# Altium PCB MCU.PcbDoc (part 2 of 3)
Units mm, origin at the board's own origin, x right, y up, seen from the top; angles counter-clockwise.
Board outline 98.27 x 98.24 mm, 2 copper layers (Top Layer, Bottom Layer); 274 components, 263 nets, 1117 pads, 8 vias.
Unrouted connection lines stored in the file: 819.
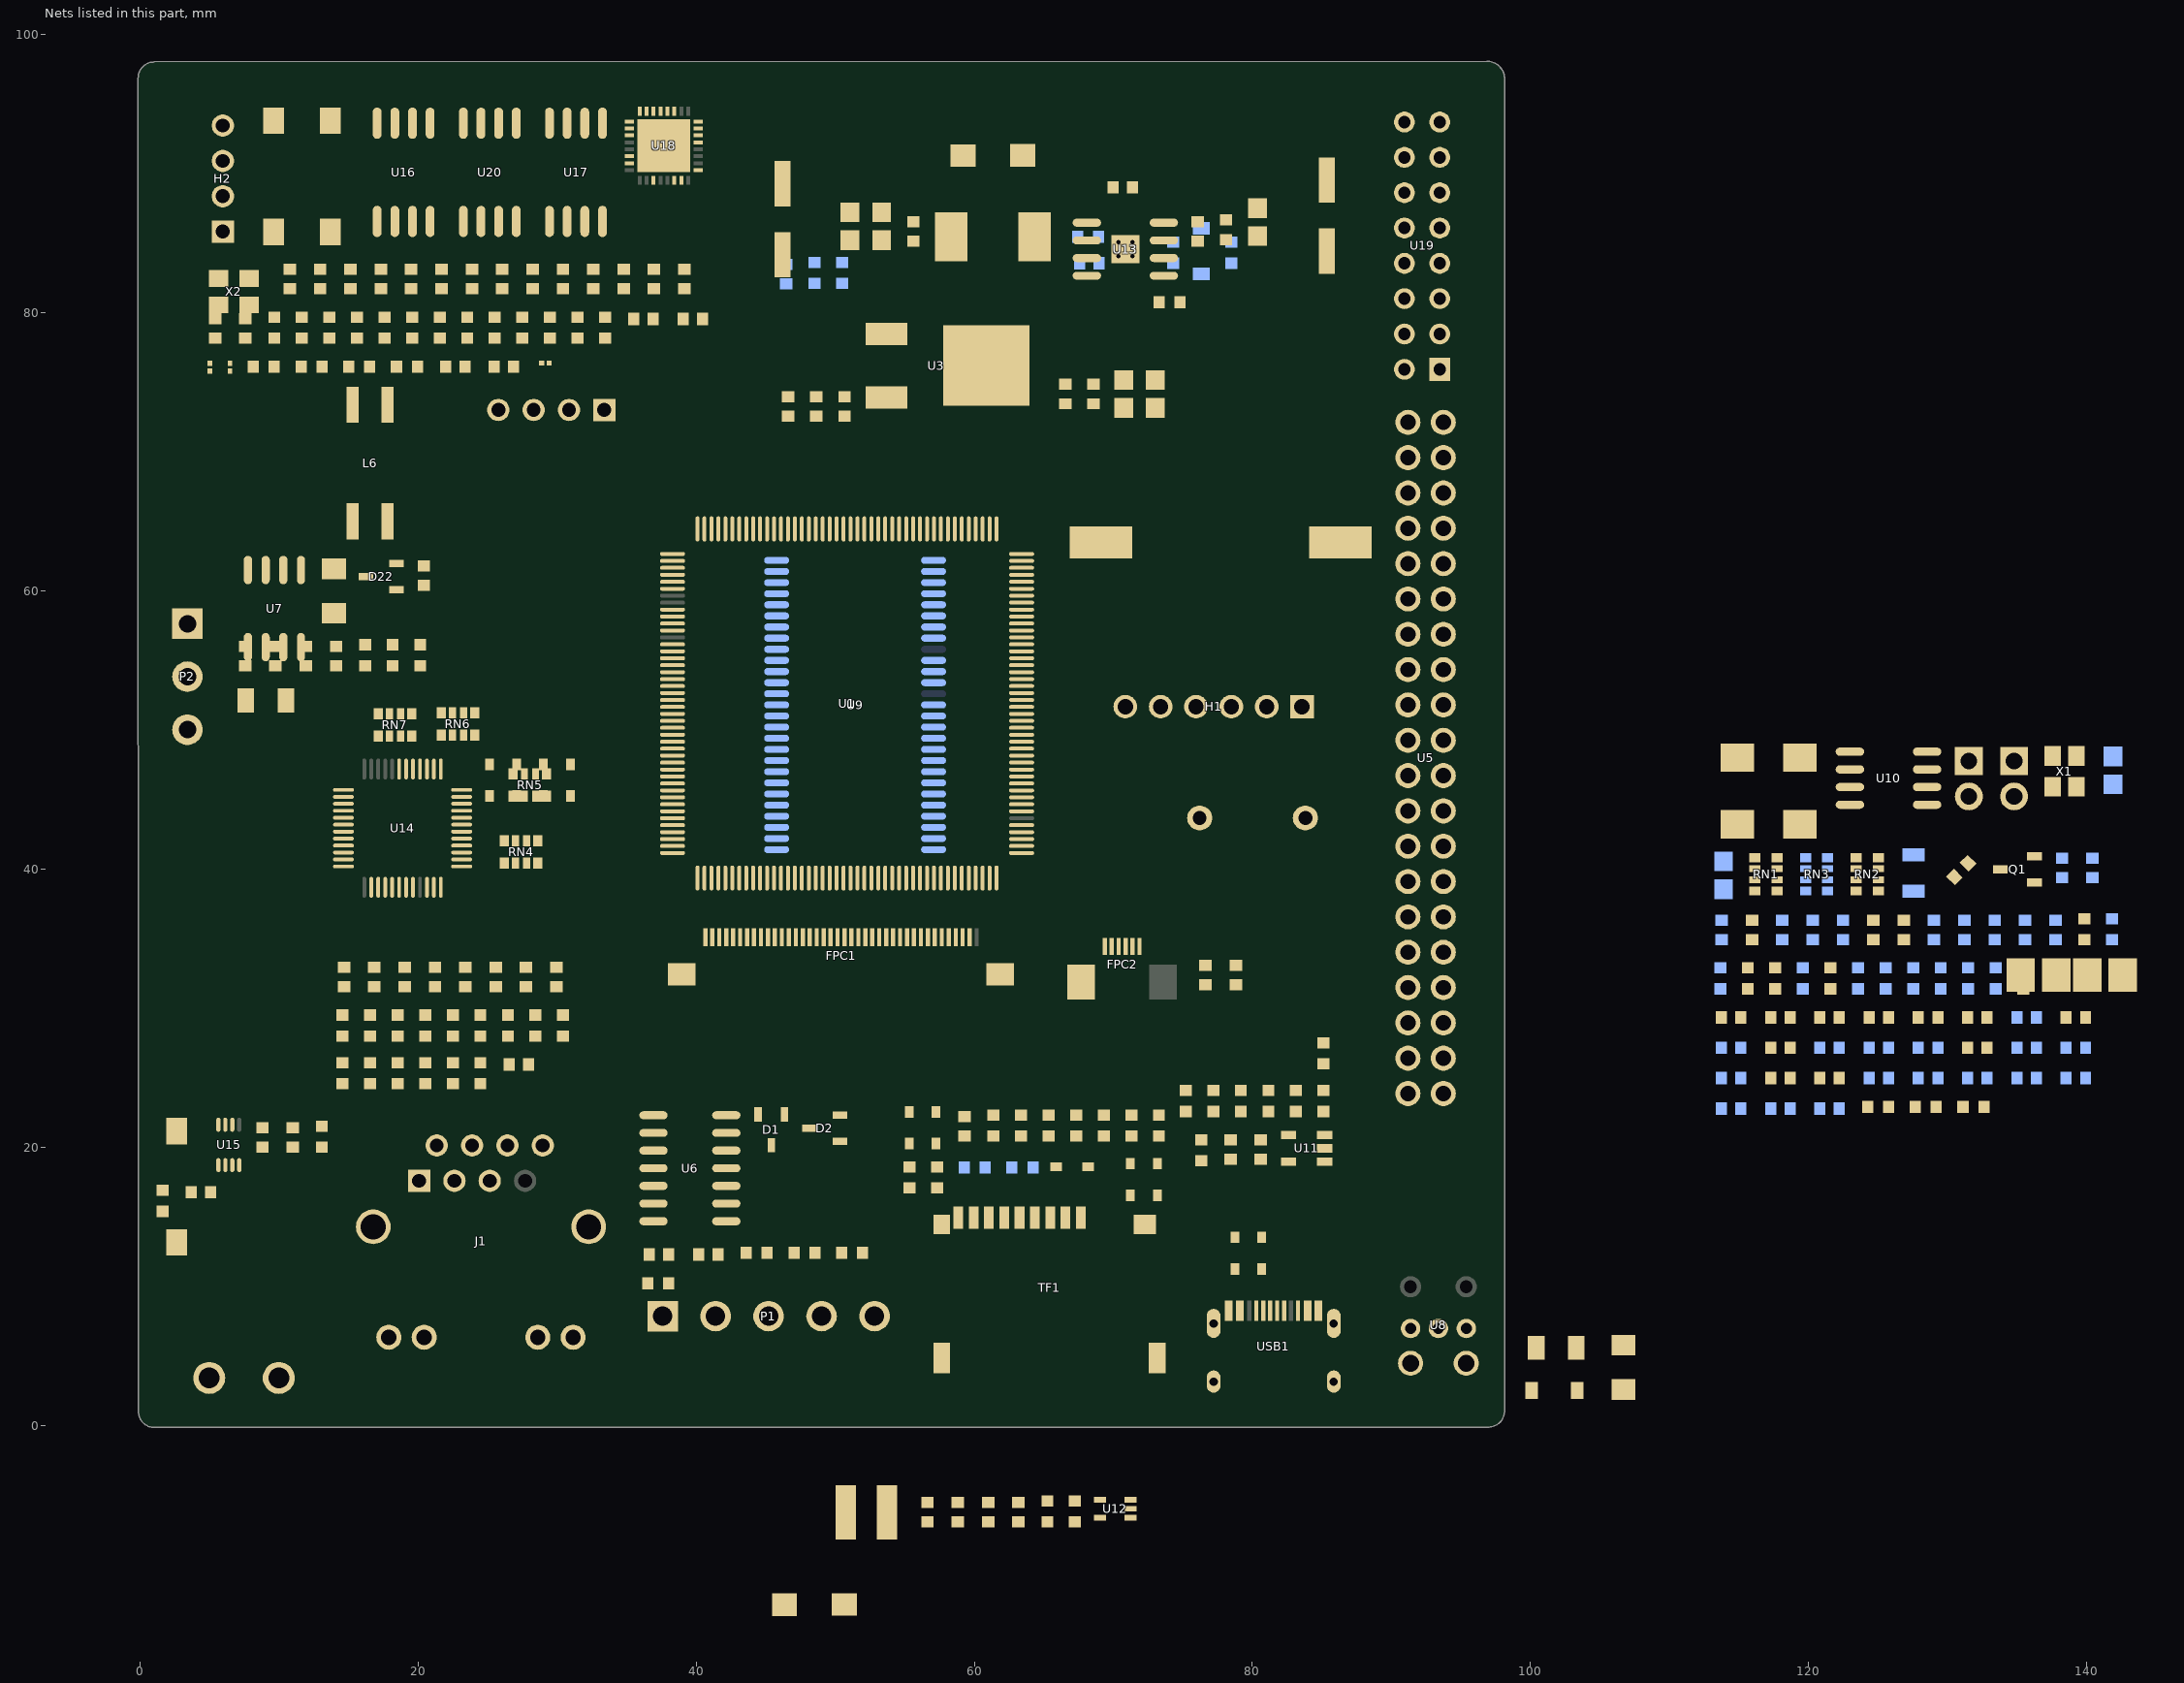
[diagram p2: the nets of this part, all layers, seen from the top]

## Part data
BUZZER1: "驱动方式:有源(内含驱动线路);构造类型:电磁式;额定电压:5V;频率:2.4kHz;声压(SPL):85dB;", Continuous Operating Time=-, Current Consumption=30mA, JLCPCB Part Class="Extended Part", LCSC Part Name="有源(内含驱动线路) 电磁式 2.4kHz", Manufacturer=华能, ManufacturerPart=TMB12A05, Operating Temperature=-40℃~+85℃, Voltage - Supply=4V~8V, Voltage Rating=5V, AddInBom=yes, ConvertToPcb=yes, Datasheet=https://item.szlcsc.com/datasheet/TMB12A05/97297.html, Diameter(φD)=12mm, Driver Circuitry=有源(内含驱动线路), FootprintName=BUZ-TH_BD12.0-P7.60-D0.6-FD, Height=9.8mm, Lead Pitch=-, Length=-, ModelId=16ab50e14c5b4f2c986c135bdba60e37, ModelName=BUZ-TH_D12.0-H9.5-P7.60, ModelTransform=472.44,472.176,0,90,0,0,-0.787,0,-177.165, Mounting Type=插件, Sound Pressure Level(SPL)=85dB, Supplier=LCSC, Supplier Footprint=插件,D=12mm, SupplierPart=C96093, Symbol=TMB12A05, Technology=电磁式, Width=-
C1 C2 C3 C4 C7 C8 C9 C10 C11 C12 C13 C14 C15 C17 C18 C19 C20 C21 C22 C23 C24 C25 C26 C27 C28 C29 C30 C31 C32 C33 C34 C35 C36 C37 C38 C39 C40 C41 C43 C44 C45 C46 C47 C48 C49 C50 C51 C52 C53 C54 C55 C60 C61 C65 C66 C67 C68 C69 C70 C71 C72 C73 C76 C78 C79 C80 C81 C82 C83 C84 C85 C86 C87 C88 C89 C92 C93 C94 C95 C96 C97 C99 C101 C102 C103 C104 C105 C106 C107 C108 C112 C114: library part C0603, "Capacitor", LatestRevisionDate=17-Jul-2002, LatestRevisionNote="Re-released for DXP Platform.", Published=8-Jun-2000, Publisher="Altium Limited"
C5 C6 C16 C42 C74 C75 C98: library part C0805, "Capacitor", LatestRevisionDate=17-Jul-2002, LatestRevisionNote="Re-released for DXP Platform.", Published=8-Jun-2000, Publisher="Altium Limited"
C56 C57 C58 C59: library part C0603_1, "Capacitor", LatestRevisionDate=17-Jul-2002, LatestRevisionNote="Re-released for DXP Platform.", Published=8-Jun-2000, Publisher="Altium Limited"
C62 C63 C64: library part C0603, "CAP CER 0.1UF 50V, 10% X7R 0603", LatestRevisionDate=17-Jul-2002, LatestRevisionNote="Re-released for DXP Platform.", Published=8-Jun-2000, Publisher="Altium Limited"
C77 C100: library part ma35v100m6x8, "容值:100uF;精度:±20%;额定电压:35V;纹波电流:2.9A@100kHz;等效串联电阻(ESR):30mΩ@100kHz;类型:聚合物;", Equivalent Series Resistance(ESR)=30mΩ@100kHz, JLCPCB Part Class="Extended Part", LCSC Part Name="100uF ±20% 35V", Manufacturer=JIERR(捷而瑞), ManufacturerPart=MA35V100M6X8, Operating Temperature=-55℃~+105℃, Ripple Current=2.9A@100kHz, Tolerance=±20%, Voltage Rating=35V, AddInBom=yes, ConvertToPcb=yes, Datasheet=https://item.szlcsc.com/datasheet/MA35V100M6X8/48680161.html, Diameter=6.3mm, FootprintName=CAP-SMD_BD6.3-L6.6-W6.6-RD, Height - Seated (Max)=7mm, Lifetime=2000hrs@105℃, ModelId=901941a22e384f799727a46cfda77174, ModelName=CAP-SMD_L6.6-W6.6-H7.0-LS7.2, ModelTransform=307.086,259.842,0,0,0,0,0,0,0, Polarity type=有极性, Supplier=LCSC, Supplier Footprint=SMD,D6.3xL7.7mm, SupplierPart=C46550467, Symbol=MA35V100M6X8, Type=聚合物
C90 C91: library part 0201-C, "容值:1uF;精度:±20%;额定电压:6.3V;温度系数:X5R;", JLCPCB Part Class="Extended Part", LCSC Part Name="1uF ±20% 6.3V", Manufacturer=muRata(村田), ManufacturerPart=GRM033R60J105MEA2D, Temperature Coefficient=X5R, Tolerance=±20%, Voltage Rating=6.3V, AddInBom=yes, ConvertToPcb=yes, Datasheet=https://item.szlcsc.com/datasheet/GRM033R60J105MEA2D/78057.html, FootprintName=C0201, ModelId=e8033a7cb35143ffb28e3b81b2577ea0, ModelName=C0201_L0.6-W0.3-H0.3, ModelTransform=23.622,11.811,0,0,0,0,0,0,0, Supplier=LCSC, Supplier Footprint=0201, SupplierPart=C76930, Symbol=GRM033R60J105MEA2D
C109 C111: library part cc1206kkx7rdbb102, "容值:1nF;精度:±10%;额定电压:2kV;温度系数:X7R;", JLCPCB Part Class="Extended Part", LCSC Part Name="1nF ±10% 2kV", Manufacturer=YAGEO(国巨), ManufacturerPart=CC1206KKX7RDBB102, Temperature Coefficient=X7R, Tolerance=±10%, Voltage Rating=2kV, AddInBom=yes, ConvertToPcb=yes, Datasheet=https://item.szlcsc.com/datasheet/CC1206KKX7RDBB102/24367.html, FootprintName=C1206, ModelId=e4be705b945545a48e666415e3682bd8, ModelName=C1206_L3.2-W1.6-H1.3, ModelTransform=125.984,62.992,0,0,0,0,0,0,0, Supplier=LCSC, Supplier Footprint=1206, SupplierPart=C23631, Symbol=CC1206KKX7RDBB102
D1 D2 D22: "极性:单向;反向截止电压(Vrwm):12V;钳位电压:19V;峰值脉冲电流(Ipp):34A@8/20us；30A@8/20us;峰值脉冲功率(Ppp):600W@8/20us;击穿电压(VBR):13.3V;", Clamping Voltage=19V, JLCPCB Part Class="Basic Part", Junction Capacitance=75pF, LCSC Part Name="单向TVS 12V截止 峰值浪涌电流：34A@8/20us 30A@8/20us", Manufacturer=PROTEK, ManufacturerPart=PSM712-LF-T7, Operating Temperature=-55℃~+150℃, Peak Pulse Current (Ipp)=34A@8/20us；30A@8/20us, Peak Pulse Power Dissipation (Ppp)=600W@8/20us, Reverse Leakage Current (Ir)=1uA；20uA, Reverse Stand-Off Voltage (Vrwm)=12V, Voltage - Breakdown=13.3V, AddInBom=yes, ConvertToPcb=yes, Datasheet=https://item.szlcsc.com/datasheet/PSM712-LF-T7/33642.html, FootprintName=SOT-23-3_L3.0-W1.7-P0.95-LS2.9-BR, level of protection="IEC 61000-4-4；IEC 61000-4-5；IEC 61000-4-2", ModelId=89cb27a44ab2466697082bb9fd73a7d0, ModelName=SOT-23-3L_L2.9-W1.6-H1.1-LS2.8-P0.95, ModelTransform=114.173,110.236,0,90,0,0,0,0,0, Polarity=单向, Supplier=LCSC, Supplier Footprint=SOT-23, SupplierPart=C32677, Symbol=PSM712-LF-T7, Type=TVS
D3 D6: library part ss34_c7420365, "二极管配置:独立式;正向压降(Vf):550mV@3A;直流反向耐压(Vr):40V;整流电流:3A;", Current - Rectified=3A, JLCPCB Part Class="Extended Part", LCSC Part Name="电压:40V 电流:3A", Manufacturer=R+O(宏嘉诚), ManufacturerPart=SS34, Reverse Leakage Current (Ir)=200uA@40V, Voltage - DC Reverse(Vr)=40V, Voltage - Forward(Vf@If)=550mV@3A, AddInBom=yes, ConvertToPcb=yes, Datasheet=https://item.szlcsc.com/datasheet/SS34/8397187.html, Diode Configuration=独立式, FootprintName=SMA_L4.3-W2.6-LS5.0-FD, ModelId=7e24bebe6cd74171ae8c9de6fc5b78aa, ModelName=SMA_L4.3-W2.6-LS5.0-FD, ModelTransform=198.4248,103.5431,0,180,0,0,-0.001,0,0, Supplier=LCSC, Supplier Footprint=SMA(DO-214AC), SupplierPart=C7420365, Symbol=SS34_C7420365
D4 D5 D8 D9: library part SMBJ5.0CA_C19077559, "PWR 5V", Clamping Voltage=9.2V, JLCPCB Part Class="Extended Part", Manufacturer=宏嘉诚, Operating Temperature=-, Peak Pulse Current (Ipp)=65.22A, Peak Pulse Power Dissipation (Ppp)=600W, Reverse Leakage Current (Ir)=800uA, Reverse Stand-Off Voltage (Vrwm)=5V, Voltage - Breakdown=7V, Add into BOM=yes, Convert to PCB=yes, Datasheet=https://atta.szlcsc.com/upload/public/pdf/source/20250107/474F05451FC8AB27D7FA0238914F96F6.pdf, Device=SMBJ5.0CA_C19077559, LCSC Part Name=SMBJ5.0CA, Manufacturer Part=SMBJ5.0CA, Polarity=双向, Supplier=LCSC, Supplier Footprint=SMB, Supplier Part=C19077559, Symbol=SMBJ5.0CA_C19077559, Type=TVS
D10 D11 D12 D13 D14 D15 D16 D17 D18 D20 D21: "极性:单向;反向截止电压(Vrwm):3.6V;钳位电压:7.7V;峰值脉冲电流(Ipp):25A@8/20us;峰值脉冲功率(Ppp):170W@8/20us;击穿电压(VBR):7.5V;", Clamping Voltage=7.7V, JLCPCB Part Class="Extended Part", Junction Capacitance=4.5pF, LCSC Part Name="单向TVS 3.6V截止 峰值浪涌电流：25A@8/20us", Manufacturer=TI(德州仪器), ManufacturerPart=ESDS311DYFR, Operating Temperature=-40℃~+125℃, Peak Pulse Current (Ipp)=25A@8/20us, Peak Pulse Power Dissipation (Ppp)=170W@8/20us, Reverse Leakage Current (Ir)=5nA, Reverse Stand-Off Voltage (Vrwm)=3.6V, Voltage - Breakdown=7.5V, AddInBom=yes, ConvertToPcb=yes, Datasheet=https://www.ti.com.cn/cn/lit/ds/symlink/esds311.pdf?ts=1736913524660&ref_url=https%253A%252F%252Fwww.ti.com.cn%252Fsitesearch%252Fzh-cn%252Fdocs%252Funiversalsearch.tsp%253FlangPref%253Dzh-CN%2526nr%253D9%2526searchTerm%253DESDS311DYFR, FootprintName=SOD-323_L1.7-W1.3-LS2.6-RD-1, level of protection="IEC 61000-4-4；IEC 61000-4-5；IEC 61000-4-2", ModelId=eba151483b2844ffacda3a6d97308fa1, ModelName=SOD-323_L1.7-W1.3-LS2.6-RD-1, ModelTransform=100.394,49.2125,0,0,0,0,0,0,0, Number of Channels=单路, Polarity=单向, Supplier=LCSC, Supplier Footprint=SOD-323, SupplierPart=C30938562, SymbolName=ESDS311DYFR, Type=TVS
FPC1: "锁定特性:翻盖式;触点类型:下接;触点数量:40P;间距:0.5mm;安装方式:卧贴;工作温度:-45℃~+85℃;", Current Rating (Max)=500mA, JLCPCB Part Class="Extended Part", LCSC Part Name="翻盖式 下接 P数:40P 间距:0.5mm", Manufacturer=JS(钜硕电子), ManufacturerPart=AFC01-S40FCA-00, Operating Temperature=-45℃~+85℃, Rated Voltage (Max)=50V, AddInBom=yes, Contact Material=铜合金, Contact Plating=锡, Contact Type=下接, ConvertToPcb=yes, Datasheet=https://item.szlcsc.com/datasheet/AFC01-S40FCA-00/253933.html, FFC, FCB Thickness=0.3mm, FootprintName=FPC-SMD_AFC01-S40FCA-00, Height Above Board=2mm, Locking Feature=翻盖式, ModelId=458e5f3c71f743329f5584acd337d3c8, ModelName=FPC-SMD_AFC01-S40FCA-00, ModelTransform=961.0217,240.157,0,0,0,0,0,-52.441,0, Mounting Type=卧贴, Number of Contacts=40P, Pitch=0.5mm, Supplier=LCSC, Supplier Footprint=SMD,P=0.5mm,卧贴, SupplierPart=C262674, Symbol=AFC01-S40FCA-00
FPC2: library part fpc-05f-6ph20_1, "锁定特性:翻盖式;触点类型:下接;触点数量:6P;间距:0.5mm;安装方式:卧贴;工作温度:-25℃~+85℃;", Current Rating (Max)=500mA, JLCPCB Part Class="Extended Part", LCSC Part Name="翻盖式 下接 P数:6P 间距:0.5mm", Manufacturer=XUNPU(讯普), ManufacturerPart=FPC-05F-6PH20, Operating Temperature=-25℃~+85℃, Rated Voltage (Max)=50V, AddInBom=yes, Contact Material=磷青铜, Contact Plating=锡, Contact Type=下接, ConvertToPcb=yes, Datasheet=https://item.szlcsc.com/datasheet/FPC-05F-6PH20/3056894.html, FFC, FCB Thickness=0.3mm, FootprintName=FPC-SMD_6P-P0.50_XUNPU_FPC-05F-6PH20, Height Above Board=2mm, Locking Feature=翻盖式, ModelId=f0153d283bb647ab8cc6ddf5c8ee15be, ModelName=FPC-SMD_6P-P0.50_XUNPU_FPC-05F-6PH20, ModelTransform=291.338,220.472,0,0,0,0,-0.001,-45.276,0, Mounting Type=卧贴, Number of Contacts=6P, Pitch=0.5mm, Supplier=LCSC, Supplier Footprint=SMD,P=0.5mm,卧贴, SupplierPart=C2856796, Symbol=FPC-05F-6PH20
H1: "插针结构:1x6P;间距:2.54mm;行距:-;圆针/方针:方针;安装方式:直插;排数:单排;总PIN位数:6P;额定电流:3A;额定电压:250V;配合针长度:6mm;塑高:2.5mm;端接针长度:3mm;触头材质:黄铜;触头镀层:-;工作温度:-40℃~+105℃;颜色:黑色;", Color=黑色, Current Rating=3A, JLCPCB Part Class="Extended Part", LCSC Part Name="1x6P 间距:2.54mm 方针 直插", Manufacturer=XFCN(兴飞), ManufacturerPart=PZ254V-11-06P, Operating Temperature=-40℃~+105℃, Voltage Rating (Max)=250V, AddInBom=yes, Circluar Pins/Square Pins=方针, Contact Material=黄铜, Contact Plating=-, ConvertToPcb=yes, Datasheet=https://item.szlcsc.com/datasheet/PZ254V-11-06P/502961.html, FootprintName=HDR-TH_6P-P2.54-V-M, Insulation Height=2.5mm, Length of End Connection Pin=3mm, Length of Mating Pin=6mm, ModelId=66a147c6933d4029b68665bbcd1e2924, ModelName=HDR-TH_6P-P2.54-M-LI-1X6P, ModelTransform=590.1563,98.425,0,0,0,0,0,0,-118.11, Mounting Type=直插, Number of Pins=6P, Number of Rows=单排, Pin Structure=1x6P, Pitch=2.54mm, Row Spacing=-, Supplier=LCSC, Supplier Footprint=插件,P=2.54mm, SupplierPart=C492405, Symbol=PZ254V-11-06P
H2: "插针结构:1x4P;间距:2.54mm;圆针/方针:方针;排数:单排;总PIN位数:4P;额定电流:3A;额定电压:250V;塑高:2.5mm;端接针长度:3mm;触头材质:黄铜;触头镀层:金;工作温度:-25℃~+80℃;颜色:黑色;", Color=黑色, Current Rating=3A, JLCPCB Part Class="Extended Part", LCSC Part Name="1x4P 间距:2.54mm 方针", Manufacturer=莱联, ManufacturerPart=LAIL-PZ2.54-4P-L, Operating Temperature=-25℃~+80℃, Voltage Rating (Max)=250V, AddInBom=yes, Circluar Pins/Square Pins=方针, Contact Material=黄铜, Contact Plating=金, ConvertToPcb=yes, Datasheet=https://item.szlcsc.com/datasheet/LAIL-PZ2.54-4P-L/58519955.html, FootprintName=CONN-TH_LAIL-PZ2.54-4P-L, Insulation Height=2.5mm, Length of End Connection Pin=3mm, ModelId=112b012cb4004446aa5386c9c86d05f0, ModelName=CONN-TH_LAIL-PZ2.54-4P-L, ModelTransform=400.039,100,0,0,0,0,0,0,-118.11, Number of Pins=4P, Number of Rows=单排, Pin Structure=1x4P, Pitch=2.54mm, Supplier=LCSC, Supplier Footprint=插件,P=2.54mm, SupplierPart=C54950602, SymbolName=LAIL-PZ2.54-4P-L
H3 H4: "插针结构:1x2P;间距:2.54mm;行距:-;圆针/方针:方针;安装方式:直插;排数:单排;总PIN位数:2P;额定电流:3A;额定电压:250V;配合针长度:6mm;塑高:2.5mm;端接针长度:3mm;触头材质:黄铜;触头镀层:-;工作温度:-40℃~+105℃;颜色:黑色;", Color=黑色, Current Rating=3A, JLCPCB Part Class="Extended Part", LCSC Part Name="1x2P 间距:2.54mm 方针 直插", Manufacturer=XFCN(兴飞), ManufacturerPart=PZ254V-11-02P, Operating Temperature=-40℃~+105℃, Voltage Rating (Max)=250V, AddInBom=yes, Circluar Pins/Square Pins=方针, Contact Material=黄铜, Contact Plating=-, ConvertToPcb=yes, Datasheet=https://item.szlcsc.com/datasheet/PZ254V-11-02P/502957.html, FootprintName=HDR-TH_2P-P2.54-V-M, Insulation Height=2.5mm, Length of End Connection Pin=3mm, Length of Mating Pin=6mm, ModelId=e35305ec3aa84b66b849f914b715e73f, ModelName=HDR2.54-M-LI-1X2P, ModelTransform=200,100,0,0,0,0,0,0,-118.11, Mounting Type=直插, Number of Pins=2P, Number of Rows=单排, Pin Structure=1x2P, Pitch=2.54mm, Row Spacing=-, Supplier=LCSC, Supplier Footprint=插件,P=2.54mm, SupplierPart=C492401, Symbol=PZ254V-11-02P
J1: library part hr911105a_c12074, "连接器类型:RJ45插座;安装方式:弯插;端口数量:1;LED:带LED;屏蔽:有屏蔽;等级:-;触头材质:磷青铜;触头镀层:金;工作温度:0℃~+70℃;", JLCPCB Part Class="Extended Part", LCSC Part Name="弯插 带LED", Manufacturer=HANRUN(汉仁), ManufacturerPart=HR911105A, Operating Temperature=0℃~+70℃, Ratings=-, AddInBom=yes, Connector Type=RJ45插座, Contact Material=磷青铜, Contact Plating=金, ConvertToPcb=yes, Datasheet=https://item.szlcsc.com/datasheet/HR911105A/12651.html, FootprintName=RJ45-TH_HR911105A, LED=带LED, ModelId=269ece015cf14129b359f9a66aa2dc0d, ModelName=RJ45-TH_HR911105A, ModelTransform=624.711,850.392,0,0,0,0,0,-89.567,-129.921, Mounting Type=弯插, Number of Ports=1, PoE=不带PoE, Shielding=有屏蔽, Supplementary Features=带滤波, Supplier=LCSC, Supplier Footprint=插件, SupplierPart=C12074, Symbol=HR911105A_C12074
KEY1: library part tl1100cf160q_1, "电路结构:单刀单掷;按钮形状:矩形按钮;作用力:1.6N;安装方式:弯插;开关高度:3.4mm;触点电流:50mA;额定电压:12V;带灯:-;工作寿命:-;", Contact Current=50mA, JLCPCB Part Class="Extended Part", LCSC Part Name=160±50gf, Manufacturer=E-Switch, ManufacturerPart=TL1100CF160Q, Operating Force=1.6N, Operating Temperature=-20℃~+70℃, Voltage Rating=12V, Actuator Style=矩形按钮, AddInBom=yes, Circuit=单刀单掷, ConvertToPcb=yes, Datasheet=https://item.szlcsc.com/datasheet/TL1100CF160Q/261742.html, FootprintName=KEY-TH_TL1100CF160Q, Life=-, ModelId=1bf1ce24b3274fed8320dde5481a5829, ModelName=KEY-TH_2P-L13.1-W13.3-H14.7-P5.0, ModelTransform=515.747,531.495,0,0,0,0,0,7.323,-137.795, Mounting Type=弯插, Supplier=LCSC, Supplier Footprint=插件,12x12mm, SupplierPart=C273459, Switch Height=3.4mm, Symbol=TL1100CF160Q, Termination Style=PC引脚, With Lamp=-
L1: library part LPS4018-472MRC, "0805  INDUCTOR MULTILAYER", DC Resistance (DCR)=340mΩ, Frequency - Self Resonant=90MHz, JLCPCB Part Class="Extended Part", LCSC Part Name="3.3uH ±20% 200mA", Manufacturer=TDK, Manufacturer Part=MLZ2012A3R3WT000, Q @ Freq=-, Saturation Current (Isat)=200mA, Tolerance=±20%, Add into BOM=yes, Convert to PCB=yes, Datasheet=https://atta.szlcsc.com/upload/public/pdf/source/20200324/C383404_6F95903E86AEDF16368640ABB3D81E0E.pdf, Device=MLZ2012A3R3WT000, Rated Current=-, Ratings=-, Supplier=LCSC, Supplier Footprint=0805, Supplier Part=C383399, Symbol=MLZ2012A3R3WT000
L2: "电感值:6.8uH;精度:±20%;额定电流:4.5A;饱和电流(Isat):5.5A;类型:一体成型电感;", Current - Saturation(Isat)=5.5A, Current Rating=4.5A, DC Resistance(DCR)=68mΩ, JLCPCB Part Class="Extended Part", LCSC Part Name="10uH ±20% 5.5A", Manufacturer=cjiang(长江微电), ManufacturerPart=FXL0630-100-M, Ratings=-, Tolerance=±20%, AddInBom=yes, ConvertToPcb=yes, Datasheet=https://item.szlcsc.com/datasheet/FXL0630-100-M/178606.html, FootprintName=IND-SMD_L7.3-W6.8, ModelId=e28854526ca747668ea12fbe1dd39a63, ModelName=IND-SMD_L7.3-W6.8-H3.0, ModelTransform=292.125,267.716,0,0,0,0,0,0,0, Supplier=LCSC, Supplier Footprint=SMD,7x6.6mm, SupplierPart=C167223, Symbol=FXL0630-100-M, Type=一体成型电感
L3 L5: library part L0603, "电感值:10uH;精度:±10%;额定电流:3mA;饱和电流(Isat):-;直流电阻(DCR):1.85Ω;", Current - Saturation (Isat)=-, Current Rating=3mA, DC Resistance(DCR)=1.85Ω, Frequency - Self Resonant=17MHz, JLCPCB Part Class="Basic Part", LCSC Part Name="10uH ±10%", Manufacturer=Sunlord(顺络), ManufacturerPart=SDFL1608S100KTF, Q @ Frequency=30@2MHz, Tolerance=±10%, AddInBom=yes, ConvertToPcb=yes, Datasheet=https://item.szlcsc.com/datasheet/SDFL1608S100KTF/1387.html, FootprintName=L0603, ModelId=2bc5ec593d464d6ba9807aec0b5673c2, ModelName=L0603_L1.6-W0.8-H0.5_BEAD, ModelTransform=62.992,31.496,0,180,0,0,0.094,0.629,0, Ratings=-, Supplier=LCSC, Supplier Footprint=0603, SupplierPart=C1035, Symbol=SDFL1608S100KTF
L4: library part 0201-L, "电感值:2nH;精度:-;额定电流:600mA;饱和电流(Isat):-;直流电阻(DCR):150mΩ;", Current - Saturation (Isat)=-, Current Rating=600mA, DC Resistance(DCR)=150mΩ, Frequency - Self Resonant=12.5GHz, JLCPCB Part Class="Extended Part", LCSC Part Name="±0.1nH 2nH", Manufacturer=muRata(村田), ManufacturerPart=LQP03TN2N0B02D, Q @ Frequency=14@500MHz, AddInBom=yes, ConvertToPcb=yes, Datasheet=https://item.szlcsc.com/datasheet/LQP03TN2N0B02D/87301.html, FootprintName=L0201-RD, ModelId=62bef5db133646c7914ab8b9bdc86b60, ModelName=L0201-RD, ModelTransform=23.622,11.811,0,0,0,0,0,0,0, Supplier=LCSC, Supplier Footprint=0201, SupplierPart=C86125, Symbol=LQP03TN2N0B02D, Tolerance=-, Type=厚膜电感
L6: "通道数:2;电感@频率:51uH@100kHz;直流电阻(DCR):140mΩ;", Current Rating=800mA, DC Resistance(DCR)=140mΩ, Inductance @ Frequency=51uH@100kHz, JLCPCB Part Class="Extended Part", LCSC Part Name="两路 贴片共模滤波器", Manufacturer=TDK, ManufacturerPart=B82793S0513N201, Operating Temperature=-40℃~+125℃, Voltage Rating (AC)=42V, Voltage Rating - DC=80V, Voltage Withstand=250V, AddInBom=yes, ConvertToPcb=yes, Datasheet=https://item.szlcsc.com/datasheet/B82793S0513N201/98252.html, FootprintName=FILTER-SMD_4P-L9.0-W6.0_B82790, ModelId=4e9188432b8b448ba84ed56da6aff49a, ModelName=FILTER-SMD_4P-L7.1-W6.0-H4.8-LS9.0, ModelTransform=355.35937,236.22,0,90,0,0,-0.034,0,0, Number of Lines=2, Supplier=LCSC, Supplier Footprint=SMD, SupplierPart=C97047, Symbol=B82793S513N201
P1: "连接器类型:板端/插座-闭口;固定方式:无固定装置;结构:1x5P;间距:3.81mm;颜色:绿色;安装方式:弯插;排数:1;每排PIN数:5;额定电流:8A;额定电压:300V;线规 - AWG:-;线规 - 平方毫米:-;工作温度:-40℃~+105℃;", Color=绿色, Current Rating=8A, JLCPCB Part Class="Extended Part", LCSC Part Name="无固定装置 1x5P 3.81mm 排数:1 每排P数:5", Manufacturer=KANGNEX(康奈克斯电气), ManufacturerPart=WJ15EDGRC-3.81-05P-14-00A, Operating Temperature=-40℃~+105℃, Voltage Rating (Max)=300V, AddInBom=yes, Connection Type=-, Connector Type=板端/插座-闭口, ConvertToPcb=yes, Datasheet=https://item.szlcsc.com/datasheet/WJ15EDGRC-3.81-05P-14-00A/8889.html, FootprintName=CONN-TH_5P-P3.81_WJ15EDGRC-3.81-5P, ModelId=1f5bfc586d7a497a94e16b2138b9ad12, ModelName=CONN-TH_WJ3.81-WI-5P, ModelTransform=784.64406,360.2355,0,0,0,0,-0.197,-118.11,-137.795, Mounting Type=弯插, Number of Pins=5P, Number of PINs Per Row=5, Number of Positions or Pins=1x5P, Number of Rows=1, Outlet Direction (Vertical Basis)=-, Pitch=3.81mm, Supplier=LCSC, Supplier Footprint=弯插,P=3.81mm, SupplierPart=C8395, Symbol=WJ15EDGRC-3.81-5P, Termination Style=无固定装置, Wire Gauge - AWG=-, Wire Gauge - mm2=-
P2: library part WJ15EDGRC-3.81-03P-14-00A, "结构:1x3P;间距:5.08mm;颜色:绿色;安装类型:直插;排数:1;每排PIN数:3;额定电流:18A;额定电压:250V;线规 - AWG:14~30;线规 - 平方毫米:2.5;工作温度:-40℃~+105℃;", Color=绿色, Current Rating=18A, JLCPCB Part Class="Extended Part", LCSC Part Name="1x3P 5.08mm 直插 排数:1 每排P数:3", Manufacturer=KANGNEX(康奈克斯电气), ManufacturerPart=WJ500V-5.08-03P-14-00A, Operating Temperature=-40℃~+105℃, Voltage Rating (Max)=250V, AddInBom=yes, ConvertToPcb=yes, Datasheet=https://item.szlcsc.com/datasheet/WJ500V-5.08-03P-14-00A/73443.html, FootprintName=CONN-TH_3P-P5.00_WJ500V-5.08-3P, Height Above Board=14.07mm, ModelId=f80d5090781743d49abcb05979f5618f, ModelName=CONN-TH_3P-P5.00_WJ500V-5.08-3P, ModelTransform=623.621,393.7,0,0,0,0,11.811,-20.315,-177.165, Mounting Type=直插, Number of Pins=3P, Number of PINs Per Row=3, Number of Positions or Pins=1x3P, Number of Rows=1, Pitch=5.08mm, Screw Specification=M2.5, Supplier=LCSC, Supplier Footprint=插件,P=5.08mm, SupplierPart=C72334, Symbol=WJ500V-5.08-3P-14-00A, Wire Gauge - AWG=14~30, Wire Gauge - mm2=2.5
Q1: "数量:1个N沟道;漏源电压(Vdss):60V;连续漏极电流(Id):300mA;导通电阻(RDS(on)):2Ω@10V;耗散功率(Pd):350mW;阈值电压(Vgs(th)):2.5V;", Current - Continuous Drain(Id)=300mA, Drain to Source Voltage=60V, Gate Threshold Voltage (Vgs(th))=2.5V, Input Capacitance(Ciss)=-, JLCPCB Part Class="Extended Part", LCSC Part Name="1个N沟道 耐压:60V 电流:300mA", Manufacturer=VISHAY(威世), ManufacturerPart=2N7002K-T1-GE3, Operating Temperature=-55℃~+150℃, Pd - Power Dissipation=350mW, Reverse Transfer Capacitance (Crss@Vds)=2.5pF, AddInBom=yes, ConvertToPcb=yes, Datasheet=https://item.szlcsc.com/datasheet/2N7002K-T1-GE3/82596.html, FootprintName=SOT-23-3_L2.9-W1.6-P1.90-LS2.8-BR, Gate Charge(Qg)=600pC@10V, ModelId=89cb27a44ab2466697082bb9fd73a7d0, ModelName=SOT-23-3L_L2.9-W1.6-H1.1-LS2.8-P0.95, ModelTransform=114.173,110.236,0,90,0,0,0,0,0, Number=1个N沟道, RDS(on)=2Ω@10V, Supplier=LCSC, Supplier Footprint=SOT-23, SupplierPart=C81445, Symbol=2N7002K-T1-GE3
R1 R2 R3 R4 R5 R6 R7 R8 R9 R10 R11 R12 R13 R14 R15 R16 R17 R18 R19 R20 R48 R65 R70 R71 R77 R78 R81 R83 R84 R85 R86 R87 R88 R89: library part R0603, "Resistor", LatestRevisionDate=17-Jul-2002, LatestRevisionNote="Re-released for DXP Platform.", Published=8-Jun-2000, Publisher="Altium Limited"
R21 R22 R23 R24 R25 R42 R43 R44 R72 R73: library part R0603, "RES 5.1K OHM 1/10W 1% 0603 SMD", LatestRevisionDate=17-Jul-2002, LatestRevisionNote="Re-released for DXP Platform.", Published=8-Jun-2000, Publisher="Altium Limited"
R26 R27 R28 R29 R30 R31 R32 R33 R34 R35 R36 R37 R45 R46 R47 R49 R50 R51 R52 R53 R54 R55 R58 R59 R60 R61 R62 R63 R64 R66 R67 R68 R69 R74 R75: library part 0603-1KΩ-5%, "片式电阻", 物料号=NA, 物料描述=片式电阻器-0805-10KΩ-5%-JT
R38 R39 R40 R41 R56 R57: library part 0603-3KΩ-5%, "片式电阻", 物料号=NA, 物料描述=片式电阻器-0805-10KΩ-5%-JT
R76 R80: library part R1206, "特性：I Hold：0.05 ~ 3.0A。 快速响应故障电流。 尺寸1206 / 3.2×1.6mm。 低电阻。 低轮廓。 符合RoHS标准，无铅且无卤。应用：USB集线器、端口和外围设备。 计算机、手机、多媒体设备", LatestRevisionDate=17-Jul-2002, LatestRevisionNote="Re-released for DXP Platform.", Published=8-Jun-2000, Publisher="Altium Limited"
RN1 RN2 RN3 RN4 RN5 RN6 RN7: "电阻器数:4;阻值:33Ω;精度:±5%;单个元件功率:62.5mW;温度系数:±200ppm/℃;", JLCPCB Part Class="Extended Part", LCSC Part Name="33Ω ±5%", Manufacturer=UNI-ROYAL(厚声), ManufacturerPart=4D03WGJ0330T5E, Number of Resistors=4, Power(Watts)=62.5mW, Temperature Coefficient=±200ppm/℃, Tolerance=±5%, AddInBom=yes, ConvertToPcb=yes, Datasheet=https://atta.szlcsc.com/upload/public/pdf/source/20191224/C474318_2527498AE30E813171187CCD28401A71.pdf, FootprintName=RES-ARRAY-SMD_0603-8P-L3.2-W1.6-BL, ModelId=edf39f9a2dca4b9a94267f442dd4f95a, ModelName=R0603-8P_L3.2-W1.6-H0.6, ModelTransform=125.984,62.992,0,0,0,0,0,0,0, Number of Pins=8, Supplier=LCSC, Supplier Footprint=0603x4, SupplierPart=C25508, Symbol=4D03WGJ0330T5E
SW1 SW2 SW3: Actuator/Cap Color=白色带淡绿, Contact Current=50mA, Insulation Resistance=-, JLCPCB Part Class="Extended Part", LCSC Part Name="6*3.6*2.5mm 立贴 轻触开关", Manufacturer="XKB Connectivity(中国星坤)", Operating Force=260gf, Operating Temperature=-30℃~+85℃, Voltage Rating (DC)=12V, Actuator Style=矩形按钮, Add into BOM=yes, Circuit=单刀单掷, Convert to PCB=yes, Datasheet=https://atta.szlcsc.com/upload/public/pdf/source/20200227/C318938_C2E53B1EEDE37D980A33616AC086DE53.pdf, Device=TS-1101-C-W, IP Rating=-, Manufacturer Part=TS-1101-C-W, Mechanical Life=5万次, Mounting Style=立贴, Pin Style=-, Power Rating=-, Strike Gundam=不带, Supplier=LCSC, Supplier Footprint=SMD, Supplier Part=C318938, Switch Height=2.5mm, Switch Length=6mm, Switch Width=3.6mm, Symbol=TS-1101-C-W, Voltage Rating (AC)=-, With Lamp=无
TF1: "卡连接方式:自弹式;卡类型:MicroSD卡(TF卡);连接器类型:卡座;本体最大高度:1.8mm;工作温度:-40℃~+70℃;", JLCPCB Part Class="Extended Part", LCSC Part Name=9P，自弹式TF卡座, Manufacturer="SHOU HAN(首韩)", ManufacturerPart="TF-CARD H1.8", Operating Temperature=-40℃~+70℃, AddInBom=yes, Additional Card Detection Pins=-, Card Connection Mode=自弹式, Card Type=MicroSD卡(TF卡), Connector Type=卡座, ConvertToPcb=yes, Datasheet=https://item.szlcsc.com/datasheet/TF-CARD%2520H1.8/8629776.html, FootprintName=TF-SMD_TF-CARD-H1.8, Height Above Board=1.8mm, ModelId=9b9c093eaf784fafb0b50515d8d92d39, ModelName=TF-SMD_TF-CARD-H1.8, ModelTransform=631.8885,594.487,0,0,0,0,-0.002,-75.432,-23.622, Supplementary Features=-, Supplier=LCSC, Supplier Footprint=SMD, SupplierPart=C7529389, Symbol="TF-CARD H1.8"
U1: "带DSP和FPU的高性能ARM Cortex-M7 MCU，具有2 MB Flash、216 MHz CPU、ART加速器、一级缓存、SDRAM、TFT、JPEG编解码器和DFSDM", JLCPCB Part Class="Extended Part", LCSC Part Name="带DSP和FPU的高性能ARM Cortex-M7 MCU，具有2 MB Flash、216 MHz CPU、ART加速器、一级缓存、SDRAM、TFT、MIPI-DSI、JPEG编解码器和DFSDM", Manufacturer=ST(意法半导体), ManufacturerPart=STM32F769IIT6, Operating Temperature=-40℃~+85℃, Voltage - Supply=1.7V~3.6V, ADC (Bit)=12bit, AddInBom=yes, ConvertToPcb=yes, Core Size="32 Bit", CPU Core="ARM Cortex-M7", CPU Maximum Speed=216MHz, DAC (Bit)=12bit, Datasheet=https://item.szlcsc.com/datasheet/STM32F769IIT6/1431509.html, EEPROM=-, FootprintName=LQFP-176_L24.0-W24.0-P0.50-LS26.0-BL, ModelId=ba4969d0451d4639a6cc599ef1fcd110, ModelName=LQFP-176_L24.0-W24.0-H1.4-LS26.0-P0.50, ModelTransform=1023.62,1023.62,0,90,0,0,0,0,0, Number of I/O=140, Oscillator Type=内置, Program Memory Type=FLASH, Program Storage Size=2MB, RAM Size=512KB, Supplier=LCSC, Supplier Footprint=LQFP-176(24x24), SupplierPart=C1341228, Symbol=STM32F769IIT6
U2: "连接器类型:电池底座;适用电池规格:CR1220;", JLCPCB Part Class="Extended Part", LCSC Part Name="电池底座 适用电池:CR1220", Manufacturer=kinghelm(金航标), ManufacturerPart=KH-CR1220-2, AddInBom=yes, Battery Type=CR1220, Connector Type=电池底座, ConvertToPcb=yes, Datasheet=https://item.szlcsc.com/datasheet/KH-CR1220-2/6198201.html, FootprintName=BAT-SMD_CR1220-2, ModelId=aa69efc108b9406287881e5b236f6e7a, ModelName=BAT-SMD_CR1220-2, ModelTransform=777.81069,586.46209,0,180,0,0,-22.045,0,-31.496, Supplier=LCSC, Supplier Footprint=插件, SupplierPart=C5365933, Symbol=KH-CR1220-2
U3: "输出极性:正极;工作电压:18V;输出电压:3.3V;输出电流:3A;电源纹波抑制比(PSRR):72dB@(120Hz);输出类型:固定;", JLCPCB Part Class="Extended Part", LCSC Part Name="3.3V 3A 18V", Manufacturer=UTC(友顺), ManufacturerPart=UZ1085L-33-TN3-R, Operating Temperature=-40℃~+85℃, Output Current=3A, Output Voltage=3.3V, Power Supply Rejection Ratio (PSRR)=72dB@(120Hz), standby current=4mA, Voltage - Supply=18V, Voltage Dropout=1.4V@(3A), AddInBom=yes, ConvertToPcb=yes, Datasheet=https://item.szlcsc.com/datasheet/UZ1085L-33-TN3-R/136900.html, Features=过流保护；热关断, FootprintName=TO-252-2_L6.6-W6.1-P4.58-TL, ModelId=ce57f84d66384067af8a68020b6de06d, ModelName=TO-252-2L-3P_L6.6-W6.1-H2.3-LS10.1-P4.6, ModelTransform=259.842,390.52442,0,270,0,0,31.494,-0.12,0, Noise=0.003%Vout, Number of Outputs=1, Output Configuration=正极, Output Type=固定, Supplier=LCSC, Supplier Footprint=TO-252-2(DPAK), SupplierPart=C125622, Symbol=UZ1085L-33-TN3-R
U4: "晶振类型:贴片晶振;频率:32.768kHz;常温频差:±10ppm;负载电容:12.5pF;频率稳定度:±10ppm;", Equivalent Series Resistance(ESR)=70kΩ, Frequency Stability=±10ppm, JLCPCB Part Class="Extended Part", LCSC Part Name="3215 2P 32.768kHz 12.5pF ±10ppm -40~+85℃(±10ppm)", Load Capacitance=12.5pF, Manufacturer=HCI(杭晶), ManufacturerPart=FC31M2-32.768-NTLNNDTL, Operating Temperature=-40℃~+85℃, AddInBom=yes, ConvertToPcb=yes, Datasheet=https://item.szlcsc.com/datasheet/FC31M2-32.768-NTLNNDTL/5705379.html, FootprintName=CRYSTAL-SMD_L3.2-W1.5, ModelId=762d7afc596f4558a373612390f4386d, ModelName=CRYSTAL-SMD_L3.2-W1.5-1, ModelTransform=125.984,59.055,0,0,0,0,0,0,0, Normal temperature Frequency Tolerance=±10ppm, Supplier=LCSC, Supplier Footprint=SMD3215-2P, SupplierPart=C5120559, Symbol=FC31M2-32.768-NTLNNDTL, Type=贴片晶振
U5: "插孔结构:2x20P;间距:2.54mm;行距:2.54mm;圆孔/方孔:方孔;安装方式:弯插;排数:双排;总孔位数:40P;额定电流:3A;额定电压:250V;插孔方向:侧面;塑高:2.5mm;触头镀层:金镍;工作温度:-40℃~+105℃;", Current Rating=3A, JLCPCB Part Class="Extended Part", LCSC Part Name="黑色 2x20P 间距:2.54mm 弯插", Manufacturer=CONNFLY, ManufacturerPart=DS1024-2x20R2, Operating Temperature=-40℃~+105℃, Voltage Rating (Max)=250V, AddInBom=yes, Circular Hole / Square Hole=方孔, Contact Plating=金镍, ConvertToPcb=yes, Datasheet=https://item.szlcsc.com/datasheet/DS1024-2x20R2/8601981.html, FootprintName=HDR-TH_40P-P2.54-H-F-R2-C20-S2.54-W8.5, Holes Direction=侧面, Holes Structure=2x20P, Insulation Height=2.5mm, ModelId=a9ccadb72efd4c37a205c7e50d3d2ca6, ModelName=HDR-TH_40P-P2.54-H-F-R2-C20-S2.54-W8.5, ModelTransform=2023.618,499.999,0,180,0,0,0,192.917,-125.984, Mounting Type=弯插, Number of Positions=40P, Number of Rows=双排, Pitch=2.54mm, Row Spacing=2.54mm, Supplier=LCSC, Supplier Footprint=弯插,P=2.54mm, SupplierPart=C7509545, Symbol=DS1024-2X20R2
U6: library part 74hc125d_c52140399, "输入类型:标准CMOS;工作电压:2V~6V;元件数:4;每个元件位数:-;灌电流(IOL):7.8mA;拉电流(IOH):7.8mA;", Current - Output High(IOH)=7.8mA, JLCPCB Part Class="Extended Part", LCSC Part Name=带三态输出的四路缓冲器/线路驱动器, Manufacturer=MDD(辰达半导体), ManufacturerPart=74HC125D, Operating Temperature=-40℃~+125℃, Quiescent Current=40uA, Voltage - Supply=2V~6V, AddInBom=yes, Channel Type=单向, ConvertToPcb=yes, Current - Output Low(IOL)=7.8mA, Datasheet=https://item.szlcsc.com/datasheet/74HC125D/54938128.html, Features=输出使能, FootprintName=SOIC-14_L8.7-W3.9-P1.27-LS6.0-BL, Input type=标准CMOS, Logic Family=74HC, ModelId=8dbf5b715d42428c85558507ae5a252b, ModelName=SOIC-14_L8.6-W3.9-H1.8-LS6.0-P1.27, ModelTransform=338.583,236.22,0,0,0,0,0,0.001,0, Number of Bits per Element=-, Number of Elements=4, Output Type=三态, Propagation Delay=20ns@6.0V,15pF, Supplier=LCSC, Supplier Footprint=SOP-14L, SupplierPart=C52140399, SymbolName=74HC125D_C52140399
U7: "隔离CAN", Isolation Voltage(Vrms)=3750, JLCPCB Part Class="Extended Part", LCSC Part Name="CA-IS1044S 3.75kVRMS 隔离 CAN 收发器", Manufacturer=Chipanalog(川土微), ManufacturerPart=CA-IS1044S, Operating Temperature=-40℃~+125℃, AddInBom=yes, CMTI(kV/us)=100kV/us, ConvertToPcb=yes, Data Rate(Max)=2Mbps, Datasheet=https://item.szlcsc.com/datasheet/CA-IS1044S/8412095.html, Features=失效安全；总线故障检测与保护, FootprintName=SOIC-8_L4.9-W3.9-P1.27-LS6.0-BL, ModelId=e81d2f7d937b4a6ab1dca543ff5d56a4, ModelName=SOIC-8_L4.9-W3.9-H1.7-LS6.0-P1.27, ModelTransform=192.913,236.22,0,0,0,0,0,0,0, Supplier=LCSC, Supplier Footprint=SOIC-8-NB, SupplierPart=C7424699, Symbol=CA-IS1044S
U8: "旋转编码器  单联 增量型， 最大额定：DC 10V ,脉冲/定位：20/20,旋转寿命：30000次，旋转角度：360°使用温度：-20°~+70°", Current Rating (Max)=1mA, JLCPCB Part Class="Extended Part", LCSC Part Name=旋转编码器, Manufacturer=CTR(长泰尔电子), ManufacturerPart=ED08905M-FE15C7.0-C10-2053, Operating Temperature=-30℃~+70℃, Rated Voltage (Max)=5V, AddInBom=yes, ConvertToPcb=yes, Datasheet=https://item.szlcsc.com/datasheet/ED08905M-FE15C7.0-C10-2053/19389010.html, Encoder Type=增量式, FootprintName=SW-TH_CTR_ED08905M-FE15C7.0-C10-2053, Mounting Type=弯插, Number of Detents / Pulses (Incremental)=20/20, Output Form=两相输出, Supplier=LCSC, Supplier Footprint=插件, SupplierPart=C18213469, Symbol=ED08905M-FE15C7.0-C10-2053
U9: "存储容量:64Mbit;时钟频率(fc):200MHz;", Clock Frequency=200MHz, JLCPCB Part Class="Extended Part", LCSC Part Name="停产 64Mb同步动态随机存取存储器", Manufacturer=ISSI(美国芯成), ManufacturerPart=IS42S16400J-7TLI-TR, Operating Temperature=-40℃~+85℃, Voltage - Supply=3V~3.6V, AddInBom=yes, ConvertToPcb=yes, Datasheet=https://item.szlcsc.com/datasheet/IS42S16400J-7TLI-TR/96065.html, FootprintName=TSOP-54_L22.2-W10.2-P0.80-LS11.8-BL, Memory Size=64Mbit, ModelId=700c07346ffc4ca1812a693d2a0f333f, ModelName=TSOP-54_L22.2-W10.2-H1.2-LS11.8-P0.80, ModelTransform=464.567,872.538,0,90,0,0,0,-0.0005,0, Supplier=LCSC, Supplier Footprint=TSOPII-54-10.2mm, SupplierPart=C94865, Symbol=IS42S16400J-7TLI
U10: library part at24c256c-sshl-b_c615461, "接口类型:I2C;存储容量:256Kbit;时钟频率(fc):1MHz;", Clock Frequency=1MHz, JLCPCB Part Class="Extended Part", LCSC Part Name=支持I²C接口的串行EEPROM, Manufacturer=MICROCHIP(美国微芯), ManufacturerPart=AT24C256C-SSHL-B, Operating Temperature=-40℃~+85℃, Voltage - Supply=1.7V~5.5V, AddInBom=yes, ConvertToPcb=yes, Data Retention - TDR (Year)=100年, Datasheet=https://item.szlcsc.com/datasheet/AT24C256C-SSHL-B/645439.html, Features=内置上电复位(POR)；硬件写保护功能；噪声抑制功能, FootprintName=SOIC-8_L4.9-W3.9-P1.27-LS6.0-BL, Interface=I2C, Memory Size=256Kbit, ModelId=e81d2f7d937b4a6ab1dca543ff5d56a4, ModelName=SOIC-8_L4.9-W3.9-H1.7-LS6.0-P1.27, ModelTransform=192.913,236.22,0,0,0,0,0,0,0, Supplier=LCSC, Supplier Footprint=SOIC-8, SupplierPart=C615461, Symbol=AT24C256C-SSHL-B, Write Cycle Endurance=100万次, Write Cycle Time(Tw)=5ms
U11: "类型:高侧开关;通道数:1;输入控制逻辑:高电平有效;工作电压:2.7V~5.5V;最大连续电流:500mA;导通电阻:95mΩ;", JLCPCB Part Class="Extended Part", LCSC Part Name=电流限制型功率分配开关, Manufacturer=TI(德州仪器), ManufacturerPart=TPS2051BDBVR, Maximum Continuous Current=500mA, Operating Temperature	-=-40℃~+85℃, Voltage - Supply=2.7V~5.5V, AddInBom=yes, Control Input Logic=高电平有效, ConvertToPcb=yes, Datasheet=https://www.ti.com/cn/lit/ds/symlink/tps2051b.pdf, Features=短路保护；过流保护；过温保护；集成电荷泵；反向电流阻断；欠压锁定, FootprintName=SOT-23-5_L3.0-W1.7-P0.95-LS2.8-BR, ModelId=0a2a1b8f50944f73965918ad6e5fe167, ModelName=SOT-23-5_L2.9-W1.6-H1.1-LS2.8-P0.95, ModelTransform=114.173,109.636,0,180,0,0,0,0,0, Number of Channels=1, RDS(on)=95mΩ, Supplier=LCSC, Supplier Footprint=SOT-23-5, SupplierPart=C24593, Symbol=TPS2051BDBVR, Type=高侧开关
U12: "类型:DC-DC;工作电压(DC):2.7V~5.5V;开关频率:1.2MHz;通道数:1;输出电压:2.7V~38V;输出电流:-;调光:PWM;拓扑结构:升压;", Constant Current Accuracy=-, Frequency - Switching=1.2MHz, JLCPCB Part Class="Extended Part", LCSC Part Name=采用PWM控制的38V高电流升压WLED驱动器, Manufacturer=TI(德州仪器), ManufacturerPart=TPS61169DCKR, Operating Temperature=-40℃~+125℃, Output Voltage=2.7V~38V, Voltage - Input(DC)=2.7V~5.5V, AddInBom=yes, ConvertToPcb=yes, Datasheet=https://www.ti.com/cn/lit/gpn/tps61169, Dimming=PWM, Features=过温保护(OTP), FootprintName=SC-70-5_L2.1-W1.3-P0.65-LS2.1-BR, ModelId=e25de95d33824a3dab7086d8b5286abf, ModelName=SC-70-5_L2.1-W1.3-H1.0-LS2.1-P0.65, ModelTransform=82.677,78.74,0,180,0,0,0,0,0, Number of Channels=1, Output Current=-, Supplier=LCSC, Supplier Footprint=SC-70-5, SupplierPart=C71045, Switch Tube (Built-In/External)=内置, Symbol=TPS61169DCKR, Topology=升压, Type=DC-DC, Voltage - Input(AC)=-
U13: "功能类型:降压型;工作电压:4.5V~28V;输出电压:800mV~25V;输出电流:3A;输出类型:可调;", Frequency - Switching=100kHz~1.5MHz, JLCPCB Part Class="Extended Part", LCSC Part Name="降压型 3A 4.5V~28V", Manufacturer=MPS(芯源), ManufacturerPart=MP1584EN-LF-Z, Operating Temperature=-20℃~+85℃@(TA), Output Current=3A, Output Voltage=800mV~25V, Quiescent Current=100uA, Voltage - Supply=4.5V~28V, AddInBom=yes, ConvertToPcb=yes, Datasheet=https://item.szlcsc.com/datasheet/MP1584EN-LF-Z/15724.html, Features=轻载高效模式；外部补偿；过流保护, FootprintName=SOIC-8_L5.0-W4.0-P1.27-LS6.0-BL-EP2.0, Function=降压型, ModelId=d3dfb165ce8644e793b750cd6f375e75, ModelName=SOIC-8_L5.0-W4.0-P1.27-LS6.0-BL-EP2.0, ModelTransform=192.913,236.22,0,0,0,0,0,0,0, Number of Outputs=1, Output Type=可调, Supplier=LCSC, Supplier Footprint=SOIC-8-EP, SupplierPart=C15051, Switch Tube (Built-In/External)=内置, Symbol=MP1584EN-LF-Z, Synchronous Rectifier=否, Topology=降压式
U14: library part dp83848cvv/nopb, "应用功能:以太网收发器;通道数:1;MAC接口:SNI；MII；RMII;", JLCPCB Part Class="Extended Part", LCSC Part Name="DP83848C/I/VYB/YB单端口10/100 Mb/s以太网物理层收发器", Manufacturer=TI(德州仪器), ManufacturerPart=DP83848CVV/NOPB, Operating Temperature=-40℃~+105℃, Power=270mW, Voltage - Supply=3.3V, AddInBom=yes, Applications Function=以太网收发器, ConvertToPcb=yes, Data Rate=10Mbit/s；100Mbit/s, Datasheet=https://www.ti.com/cn/lit/gpn/dp83848c, Ethernet Speed Standards=10BASE-T；100BASE-TX, FootprintName=LQFP-48_L7.0-W7.0-P0.50-LS9.0-BL, MAC Interface=SNI；MII；RMII, ModelId=093be70396ff421eb2cdb946d5311efc, ModelName=LQFP-48_L7.0-W7.0-H1.4-LS9.0-P0.50, ModelTransform=354.331,354.331,0,0,0,0,0,0,0, Number of Channels=1, Supplier=LCSC, Supplier Footprint=LQFP-48(7x7), SupplierPart=C527463, Symbol=DP83848CVV/NOPB
U15: library part 74aup1g74dc,125, "类型:D-型;工作电压:800mV~3.6V;时钟频率(fc):315MHz;元件数:1;每个元件位数:1;传播延迟(tpd):5.8ns@3.3V,30pF;静态电流(Iq):500nA;", Clock Frequency=315MHz, Current - Output High(IOH)=4mA, Input Capacitance=0.6pF, JLCPCB Part Class="Extended Part", LCSC Part Name=低功耗带置位和复位功能的正边沿触发D型触发器, Manufacturer=Nexperia(安世), ManufacturerPart=74AUP1G74DC,125, Operating Temperature=-40℃~+125℃, Quiescent Current=500nA, Voltage - Supply=800mV~3.6V, AddInBom=yes, ConvertToPcb=yes, Current - Output Low(IOL)=4mA, Datasheet=https://item.szlcsc.com/datasheet/74AUP1G74DC%252C125/462011.html, FootprintName=SOT765-1_L2.0-W2.3-P0.50-LS3.1-BL, Function=置位和复位, Hold Time=-300ps, ModelId=bef3f05c8ab3428397f0f727909dae97, ModelName=SOT765-1_L2.0-W2.3-H1-P0.50-LS3.1-BL, ModelTransform=82.677,125.984,0,0,0,0,0,0,0, Number of Bits per Element=1, Number of Elements=1, Output Type=互补式, Propagation Delay=5.8ns@3.3V,30pF, Series=74AUP系列, Setup Time=300ps, Supplier=LCSC, Supplier Footprint=VSSOP-8, SupplierPart=C458192, Symbol=74AUP1G74DC,125, Synchronous/Asynchronous=异步, Trigger Type=上升沿, Type=D-型
U16 U17 U20: "接口类型:SPI;存储容量:32Mbit;时钟频率(fc):133MHz;", Clock Frequency=133MHz, JLCPCB Part Class="Extended Part", LCSC Part Name="支持双线、四线SPI接口的3V、32Mbit 串行SPI闪存", Manufacturer=Winbond(华邦), ManufacturerPart=W25Q32JVSSIQ, Operating Temperature=-40℃~+85℃, Standby Supply Current=1uA, Voltage - Supply=2.7V~3.6V, AddInBom=yes, Block Erase Time(tBE)=-, ConvertToPcb=yes, Data Retention - TDR (Year)=20年, Datasheet=https://item.szlcsc.com/datasheet/W25Q32JVSSIQ/190567.html, Features=硬件写保护；绝对写保护；写使能锁存；软件写保护；上电复位, FootprintName=SOIC-8_L5.3-W5.3-P1.27-LS8.0-BL, Interface=SPI, Memory Size=32Mbit, ModelId=f83d990ad74f400caf5ac920b7771508, ModelName=SOIC-8_L5.3-W5.3-H1.9-LS7.9-P1.27, ModelTransform=208.661,311.25654,0,0,0,0,-0.0005,0.0005,0, Page Programming Time (Tpp)=3ms, Program / Erase Cycles=100000次, Supplier=LCSC, Supplier Footprint=SOIC-8-208mil, SupplierPart=C179173, Symbol=W25Q32JVSSIQ_C179173, Write Cycle Time (tWC)=-
U18: "CPU内核:其他;CPU最大主频:160MHz;CPU位数:32 Bit;", JLCPCB Part Class="Extended Part", LCSC Part Name="不带固件 搭载RISC-V单核CPU的超低功耗片上系统（SoC），支持2.4 GHz Wi-Fi（802.11 b/g/n）和蓝牙5（低功耗）", Manufacturer=ESPRESSIF(乐鑫), ManufacturerPart=ESP32-C3, Operating Temperature=-40℃~+105℃, Voltage - Supply=3V~3.6V, ADC (Bit)=12bit, AddInBom=yes, ConvertToPcb=yes, Core Size="32 Bit", CPU Core=其他, CPU Maximum Speed=160MHz, Datasheet=https://item.szlcsc.com/datasheet/ESP32-C3/3013220.html, FootprintName=QFN-32_L5.0-W5.0-P0.50-TL-EP3.7, ModelId=1b373353bf024628a0546c2e0a05c449, ModelName=QFN-32_L5.0-W5.0-H0.9-P0.50-TL-EP3.7, ModelTransform=196.85,196.85,0,0,0,0,0,0,0, Number of I/O=22, Oscillator Type=内置+外置, RAM Size=528KB, Supplier=LCSC, Supplier Footprint=QFN-32-EP(5x5), SupplierPart=C2838500, Symbol=ESP32-C3
U19: "插孔结构:2x8P;间距:2.54mm;行距:2.54mm;圆孔/方孔:方孔;安装方式:弯插;排数:双排;总孔位数:16P;额定电流:3A;插孔方向:侧面;塑高:8.5mm;触头材质:黄铜;触头镀层:金;工作温度:-40℃~+105℃;", Current Rating=3A, JLCPCB Part Class="Extended Part", LCSC Part Name="插孔结构：2x8P 间距：2.54mm 安装方式：弯插 排数：双排 方孔", Manufacturer=JXTCONN(聚兴泰), ManufacturerPart=B254W11-0B16P51-H85C32, Operating Temperature=-40℃~+105℃, AddInBom=yes, Circular Hole / Square Hole=方孔, Contact Material=黄铜, Contact Plating=金, ConvertToPcb=yes, Datasheet=https://item.szlcsc.com/datasheet/B254W11-0B16P51-H85C32/51751274.html, FootprintName=HDR-TH_16P-P2.54-H-F-R2-C8-W8.5, Holes Direction=侧面, Holes Structure=2x8P, Insulation Height=8.5mm, ModelId=3769f9c01991404e933d2dcd4e3e6b52, ModelName=HDR-TH_16P-P2.54-H-F-R2-C8-W8.5, ModelTransform=823.62,499.999,0,0,0,0,0,-192.913,-125.984, Mounting Type=弯插, Number of Positions=16P, Number of Rows=双排, PIN Length=3.2mm, Pitch=2.54mm, Row Spacing=2.54mm, Supplier=LCSC, Supplier Footprint=弯插,P=2.54mm, SupplierPart=C49297019, Symbol=B254W11-0B16P51-H85C32
USB1: library part TYPEC-304-BCP16_C720629, Current Rating-Power=3A, JLCPCB Part Class="Extended Part", LCSC Part Name="停产 Type-C 母 卧贴", Manufacturer=XUNPU(讯普), Operating Temperature=-25℃~+85℃, Add into BOM=yes, Connector Type=Type-C, Convert to PCB=yes, Datasheet=https://atta.szlcsc.com/upload/public/pdf/source/20220210/1FE0FEFF7D6A20C111212527D3DED014.pdf, Device=TYPEC-304-BCP16_C720629, Gender=母, Manufacturer Part=TYPEC-304-BCP16, Mounting Type=卧贴, Number of Contacts=16P, Number of Ports=1, Protocol Standard="USB 3.1", Supplier=LCSC, Supplier Footprint=SMD, Supplier Part=C720629, Symbol=TYPEC-304-BCP16
X1: "晶振类型:贴片晶振;频率:25MHz;常温频差:±10ppm;负载电容:12pF;频率稳定度:±20ppm;", Frequency Stability=±20ppm, JLCPCB Part Class="Basic Part", LCSC Part Name="YSX321SL 25MHZ 4P 3225 12PF ±10PPM -40~85℃ (±20PPM)", Load Capacitance=12pF, Manufacturer=YXC(扬兴晶振), ManufacturerPart=X322525MOB4SI, Normal temperature Frequency Tolerance=±10ppm, Operating Temperature=-40℃~+85℃, AddInBom=yes, ConvertToPcb=yes, Datasheet=https://item.szlcsc.com/datasheet/X322525MOB4SI/9526.html, FootprintName=CRYSTAL-SMD_4P-L3.2-W2.5-BL, ModelId=ff2dfd5650294453a14147960efe1838, ModelName=CRYSTAL-SMD_4P-L3.2-W2.5-BL, ModelTransform=125.984,98.425,0,0,0,0,0,0,0, Supplier=LCSC, Supplier Footprint=SMD3225-4P, SupplierPart=C9006, Symbol=X322525MOB4SI, Type=贴片晶振
X2: "晶振类型:贴片晶振;频率:40MHz;常温频差:±10ppm;负载电容:15pF;频率稳定度:±20ppm;", Equivalent Series Resistance(ESR)=40Ω, Frequency Stability=±20ppm, JLCPCB Part Class="Extended Part", LCSC Part Name="YSX321SL 40MHZ 4P 3225 15PF ±10PPM -40~85℃ (±20PPM)", Load Capacitance=15pF, Manufacturer=YXC(扬兴晶振), ManufacturerPart=X322540MPB4SI, Normal temperature Frequency Tolerance=±10ppm, Operating Temperature=-40℃~+85℃, AddInBom=yes, ConvertToPcb=yes, Datasheet=https://item.szlcsc.com/datasheet/X322540MPB4SI/9530.html, FootprintName=OSC-SMD_4P-L3.2-W2.5-BL_SIT8008BI, ModelId=ae22b8d143894765bc8100c37cb6356f, ModelName=OSC-SMD_4P-L3.2-W2.5-H1.0, ModelTransform=125.984,98.425,0,0,0,0,0,0,0, Supplier=LCSC, Supplier Footprint=SMD3225-4P, SupplierPart=C9010, Symbol=X322540MPB4SI, Type=贴片晶振
ZD1 ZD2: library part DIO_ZENER_6, "9V稳压管", Brand=10V
?: library part b0505s-1wr3_c7465178, "B0505S-1WR3型号是定电压输入,隔离非稳压单路输出的DC/DC模块电源产品；输入电压5V(4.5V~5.5V)，输出电压5Vdc，输出电流200mA，输出功率1W;转换效率86%;低静态电流，低纹波系数和低噪音，超低功耗;输出可持续短路保护，自恢复;最大容性负载2400uF;适用于纯数字电路，一般低频模拟电路，继电器驱动电路，数据交换电路等 ;输入输出隔离耐压1.5KVdc ;尺寸：长11.68*高10.16*宽6.00mm", Capacitive Load(Max)=2400uF, Isolation Voltage(Vrms)=1.5kV, JLCPCB Part Class="Extended Part", LCSC Part Name="4.5V~5.5V 5V 200mA 1W", Manufacturer=EVISUN(易成), ManufacturerPart=B0505S-1WR3, Operating Temperature=-40℃~+105℃, Output Current(Max)=200mA, Output Power=1W, Output Voltage=5V, Quiescent Supply Current=6mA, Voltage - Supply=4.5V~5.5V, Voltage Regulation=非稳压型, AddInBom=yes, Conversion Efficiency=86%, ConvertToPcb=yes, Datasheet=https://item.szlcsc.com/datasheet/B0505S-1WR3/8505845.html, Features=短路保护；自动故障恢复, FootprintName=PWRM-TH_B0505S-1WR3, Height=6mm, Length=11.68mm, ModelId=30eab2842705423fac4a2e76b933247c, ModelName=PWRM-TH_B0505S-1WR3, ModelTransform=456.692,236.22,0,0,0,0,0,82.677,-157.48, Number of Outputs=1, Ripple Noise=30mVp-p, Supplier=LCSC, Supplier Footprint=SIP,11.7x6mm, SupplierPart=C7465178, Symbol=B0505S-1WR3_C7465178, Type=塑封型, Width=10.2mm

## Via types
v1: diameter 0.61, hole 0.305, Top Layer to Bottom Layer, 4 vias
v2: diameter 5, hole 3.2, Top Layer to Bottom Layer, 3 vias
v3: diameter 4.7, hole 3.2, Top Layer to Bottom Layer, 1 vias

## Nets (pads, with @x,y where several pads share a name; then routed paths per layer and width w, separated by ;. In a path a pad name is that pad's centre, name@x,y a point inside that pad or via, vN(x,y) a via of type N, cw(c..) or ccw(c..) an arc to the next point about the centre after c; other vN are vias at no path point)
+3V3: C2.2 C3.2 C7.2 C8.2 C16.2 C17.2 C18.2 C19.2 C20.2 C21.2 C22.2 C23.2 C24.2 C25.2 C26.2 C27.2 C28.2 C29.2 C30.2 C31.2 C32.2 C33.1 C36.2 C37.2 C42.2 C43.2 C44.2 C45.2 C46.2 C47.2 C48.2 C49.2 C50.2 C51.2 C52.2 C53.2 C61.2 C62.1 C63.1 C64.1 C69.2 C70.2 C81.2 C82.2 C83.2 C84.2 C85.2 C86.2 C87.2 C88.2 C92.2 C93.2 C94.2 C95.2 C96.2 C107.1 C108.2 C114.2 FPC1.3 FPC1.38 FPC2.4 H1.1 H2.3 J1.4 J1.5 J1.9 J1.12 L3.1 R1.1 R2.2 R3.2 R4.1 R8.2 R10.2 R11.1 R17.2 R18.2 R25.1 R26.2 R27.2 R28.2 R31.1 R32.1 R34.1 R35.1 R45.2 R46.2 R47.2 R48.1 R50.2 R51.2 R59.2 R60.2 R63.2 R64.2 R65.1 R66.1 R67.1 R68.2 R69.1 R70.2 R71.2 R72.1 R77.2 R78.2 R81.2 TF1.4 U1.15 U1.23 U1.36 U1.39 U1.49 U1.62 U1.72 U1.82 U1.96 U1.99 U1.118 U1.131 U1.136 U1.149 U1.159 U1.172 U3.2 U5.4 U6.14 U7.1 U9.1 U9.3 U9.9 U9.14 U9.27 U9.43 U9.49 U10.8 U14.32 U14.48 U15.2 U15.6 U15.7 U15.8 U16.8 U17.8 U18.11 U18.17 U18.31 U18.32 U19.3 U20.8
+3V3（A）: C68.2 R35.2 U14.22
+5V: ?.2 C13.2 C14.2 C15.2 C56.2 C57.2 C72.1 C73.2 C74.2 C75.2 C77.1 C103.2 C104.2 L1.1 L2.2 R19.2 R39.1 U3.3 U5.18 U5.23 U11.1
+12V: C34.2 C76.2 C97.2 C98.2 C100.1 R56.2 U5.19 U5.22 U13.7 U19.10 U19.11 U19.12
+VAUX: H3.1 U19.9
+VAUX_OUT: H4.2 U5.3
+VBUS: C54.2 C55.2 R44.2 U11.5 USB1.A4B9 USB1.B4A9 ZD1.1
BOOT0: R5.1 SW1.1 U1.166 U15.3
BYPASS_REG: R6.1 U1.48
CAN_+5V: ?.4 C105.1 C106.2 U7.8
CAN_GND: ?.3 C105.2 C106.1 C109.1 D22.3 P2.1 R76.1 U7.7
CAN_RX: U1.11 U7.3
CAN_TX: U1.168 U7.2
CANH: D22.2 P2.2 R58.2
CANL: D22.1 P2.3 R74.2
DAC_OUT1: Q1.1 R73.1 U1.50
DIN2: R14.1 U1.8
DSI_CKN: FPC1.8 U1.105
DSI_CKP: FPC1.9 U1.104
DSI_D0N: FPC1.5 U1.102
DSI_D0P: FPC1.6 U1.101
DSI_D1N: FPC1.11 U1.108
DSI_D1P: FPC1.12 U1.107
ENC_A: C38.2 R12.1 U1.119
ENC_B: C40.2 R16.1 U1.120
ENC_SW: C39.2 U1.173 U8.1
ESP_BOOT_N: R64.1 SW3.1 U1.125 U18.15
ESP_EN: C102.2 R63.1 SW2.1 U1.145 U18.7
ETH_COL: RN5.2 U1.47
ETH_CRS: RN4.4 U1.40
ETH_MDC: U1.33 U14.31
ETH_MDIO: R45.1 U1.42 U14.30
ETH_RESET_N: U1.175 U14.29
ETH_RX_CLK: RN4.2 U1.41
ETH_RX_DV: RN4.3 U1.53
ETH_RX_ERR: RN5.1 U1.79
ETH_RXD0: RN5.3 U1.54
ETH_RXD1: RN5.4 U1.55
ETH_RXD2: RN6.1 U1.83
ETH_RXD3: RN6.2 U1.84
ETH_TX_CLK: RN6.3 U1.35
ETH_TX_EN: RN6.4 U1.80
ETH_TXD0: RN7.1 U1.85
ETH_TXD1: RN7.2 U1.86
ETH_TXD2: RN7.3 U1.34
ETH_TXD3: RN7.4 U1.167
FAULT: R1.2 U1.58 U5.37 U19.4
FMC_A0: U1.16 U9.23
FMC_A1: U1.17 U9.24
FMC_A2: U1.18 U9.25
FMC_A3: U1.19 U9.26
FMC_A4: U1.20 U9.29
FMC_A5: U1.21 U9.30
FMC_A6: U1.60 U9.31
FMC_A7: U1.63 U9.32
FMC_A8: U1.64 U9.33
FMC_A9: U1.65 U9.34
FMC_A10: U1.66 U9.22
FMC_A11: U1.67 U9.35
FMC_BA0: U1.112 U9.20
FMC_BA1: U1.113 U9.21
FMC_D0: U1.97 U9.2
FMC_D1: U1.98 U9.4
FMC_D2: U1.142 U9.5
FMC_D3: U1.143 U9.7
FMC_D4: U1.68 U9.8
FMC_D5: U1.69 U9.10
FMC_D6: U1.70 U9.11
FMC_D7: U1.73 U9.13
FMC_D8: U1.74 U9.42
FMC_D9: U1.75 U9.44
FMC_D10: U1.76 U9.45
FMC_D11: U1.77 U9.47
FMC_D12: U1.78 U9.48
FMC_D13: U1.89 U9.50
FMC_D14: U1.90 U9.51
FMC_D15: U1.91 U9.53
FMC_NBL0: U1.169 U9.15
FMC_NBL1: U1.170 U9.39
FMC_SDCKE0: U1.43 U9.37
FMC_SDCLK: U1.116 U9.38
FMC_SDNCAS: U1.160 U9.17
FMC_SDNE0: U1.44 U9.19
FMC_SDNRAS: U1.59 U9.18
FMC_SDNWE: U1.32 U9.16
GND: ?.1 C1.1 C4.1 C5.1 C6.1 C7.1 C8.1 C9.2 C10.2 C11.2 C12.2 C13.1 C14.1 C15.1 C16.1 C17.1 C18.1 C19.1 C20.1 C21.1 C22.1 C23.1 C24.1 C25.1 C26.1 C27.1 C28.1 C29.1 C30.1 C31.1 C32.1 C33.2 C34.1 C35.1 C36.1 C37.1 C38.1 C39.1 C40.1 C41.1 C42.1 C43.1 C44.1 C45.1 C46.1 C47.1 C48.1 C49.1 C50.1 C51.1 C52.1 C53.1 C56.1 C57.1 C58.1 C59.1 C60.1 C61.1 C62.2 C63.2 C64.2 C65.1 C66.1 C67.1 C68.1 C69.1 C70.1 C73.1 C74.1 C75.1 C76.1 C77.2 C79.1 C80.2 C81.1 C82.1 C83.1 C84.1 C85.1 C86.1 C87.1 C88.1 C89.1 C90.1 C91.1 C92.1 C93.1 C94.1 C95.1 C96.1 C97.1 C98.1 C99.1 C100.2 C101.1 C102.1 C103.1 C104.1 C107.2 C108.1 C111.1 C112.1 C114.1 D1.3 D2.3 D4.2 D5.2 D6.1 D8.2 D9.2 D10.2 D11.2 D12.2 D13.2 D14.2 D15.2 D16.2 D17.2 D18.2 D20.2 D21.2 FPC1.4 FPC1.7 FPC1.10 FPC1.13 FPC1.14 FPC1.15 FPC1.16 FPC1.17 FPC1.18 FPC1.19 FPC1.20 FPC1.21 FPC1.22 FPC1.23 FPC1.24 FPC1.25 FPC1.26 FPC1.27 FPC1.28 FPC1.29 FPC1.30 FPC1.31 FPC1.32 FPC1.33 FPC1.35 FPC1.36 FPC1.37 FPC1.39 FPC1.41 FPC1.42 FPC2.1 FPC2.8 H1.2 H2.4 J1.8 KEY1.2 P1.3 Q1.2 R5.2 R6.2 R7.2 R20.1 R21.2 R22.2 R33.1 R38.2 R40.1 R41.2 R42.2 R43.1 R57.1 R73.2 R80.1 SW2.2 SW3.2 TF1.6 U1.14 U1.22 U1.37 U1.61 U1.71 U1.95 U1.103 U1.109 U1.117 U1.130 U1.135 U1.148 U1.158 U2.2 U3.1 U5.1 U5.8 U5.15 U5.20 U5.21 U5.24 U5.26 U5.33 U5.40 U6.1 U6.4 U6.7 U6.10 U6.13 U7.4 U8.2 U8.C U9.6 U9.12 U9.28 U9.41 U9.46 U9.52 U9.54 U10.1 U10.2 U10.3 U10.4 U10.7 U11.2 U12.2 U13.5 U13.9 U14.15 U14.19 U14.35 U14.36 U14.47 U15.4 U16.4 U17.4 U18.33 U19.13 U19.14 U19.15 U19.16 U20.4 USB1.A1B12 USB1.B1A12 X1.2 X1.4 X2.2 X2.4 ZD1.2 ZD2.2
  other v1: 70.366,84.082 71.366,84.082 70.366,85.082 71.366,85.082
I2C1_SCL: FPC2.3 R3.1 U1.164 U10.6 U19.6
I2C1_SDA: FPC2.2 R2.1 U1.165 U10.5 U19.5
I2C2_SCL: R48.2 U1.45 U5.35
I2C2_SDA: R65.2 U1.46 U5.34
LCD_EXTI7: FPC2.5 U1.115
LCD_FC_RESET: FPC2.6 U1.114
LCD_RESET: FPC1.34 U1.110
LED_ACT: R26.1 R29.1 U14.26
LED_LINK: R28.1 R30.1 U14.28
LED_SPEED: R27.1 U14.27
LEDA: C58.2 C59.2 D3.2 FPC1.1
LEDK: FPC1.2 R20.2 U12.3
MCLK_25: RN4.1 U1.123
NetBUZZER1_1: BUZZER1.1 R25.2
NetBUZZER1_2: BUZZER1.2 Q1.3
NetC2_1: C2.1 C3.1 R7.1
NetC4_2: C4.2 H3.2 H4.1 U1.6 U2.1
NetC5_2: C5.2 U1.129
NetC6_2: C6.2 U1.81
NetC35_2: C35.2 R36.1 R61.2
NetC41_2: C41.2 R37.1 R62.2
NetC54_1: C54.1 C55.1
NetC60_2: C60.2 U1.100 U1.106
NetC65_2: C65.2 C66.2 C67.2 C101.2 U14.18 U14.23 U14.37
NetC71_1: C71.1 D6.2 L2.1 U13.1
NetC71_2: C71.2 U13.8
NetC72_2: C72.2 R39.2 R41.1 U13.4
NetC78_1: C78.1 R38.1
NetC78_2: C78.2 U13.3
NetC79_2: C79.2 L5.2 X2.3
NetC80_1: C80.1 U18.29 X2.1
NetC89_2: C89.2 C99.2 L3.2 U18.2 U18.3
NetC91_2: C91.2 L4.2 U18.1
NetD1_1: D1.1 P1.5 R13.1
NetD1_2: D1.2 P1.4 R15.1
NetD2_1: D2.1 P1.2 U6.8
NetD2_2: D2.2 P1.1 U6.11
NetD3_1: D3.1 L1.2 U12.1
NetD10_1: D10.1 R77.1 R88.1 TF1.8
NetD11_1: D11.1 R78.1 R87.1 TF1.7
NetD12_1: D12.1 R17.1 R84.1 TF1.2
NetD13_1: D13.1 R18.1 R83.1 TF1.1
NetD18_1: D18.1 R85.1 TF1.3
NetD20_1: D20.1 R24.1 USB1.A7 USB1.B7
NetD21_1: D21.1 R23.1 USB1.A6 USB1.B6
NetJ1_10: J1.10 R29.2
NetJ1_11: J1.11 R30.2
NetL5_1: L5.1 U18.30
NetL6_1: L6.1 U7.5
NetL6_2: L6.2 R74.1 R75.2
NetL6_3: L6.3 R58.1 R75.1
NetL6_4: L6.4 U7.6
NetR8_1: R8.1 U1.38
NetR9_2: R9.2 U6.3
NetR10_1: R10.1 R16.2 U8.B
NetR11_2: R11.2 R12.2 U8.A
NetR13_2: R13.2 U6.2
NetR14_2: R14.2 U6.6
NetR15_2: R15.2 U6.5
NetR19_1: R19.1 U12.5
NetR21_1: R21.1 USB1.A5
NetR22_1: R22.1 USB1.B5
NetR31_2: R31.2 U14.21
NetR32_2: R32.2 U14.20
NetR33_2: R33.2 U14.24
NetR34_2: R34.2 U14.7
NetR40_2: R40.2 U13.6
NetR46_1: R46.1 U16.3
NetR47_1: R47.1 U16.7
NetR49_1: R49.1 U18.28
NetR50_1: R50.1 U17.3
NetR51_1: R51.1 U17.7
NetR52_1: R52.1 U18.24
NetR53_1: R53.1 U18.23
NetR54_1: R54.1 U18.22
NetR55_1: R55.1 U18.21
NetR56_1: R56.1 R57.2 U13.2 ZD2.1
NetR59_1: R59.1 U20.3
NetR60_1: R60.1 U20.7
NetR68_1: R68.1 U18.6
NetR69_2: R69.2 U18.14
NetR71_1: R71.1 SW1.2
NetR86_1: R86.1 TF1.5
NetR89_1: R89.1 TF1.9
NetRN1_5: RN1.5 U1.5
NetRN1_6: RN1.6 U1.3
NetRN1_7: RN1.7 U1.2
NetRN1_8: RN1.8 U1.1
NetRN2_5: RN2.5 U1.26
NetRN2_6: RN2.6 U1.27
NetRN2_7: RN2.7 U1.24
NetRN2_8: RN2.8 U1.25
NetRN3_1: RN3.1 U1.92
NetRN3_4: RN3.4 U1.162
NetRN3_6: RN3.6 U1.134
NetRN3_7: RN3.7 U1.133
NetRN4_5: RN4.5 U14.40
NetRN4_6: RN4.6 U14.39